# EAGLE board The_project v98 (EAGLE 9.7.0)
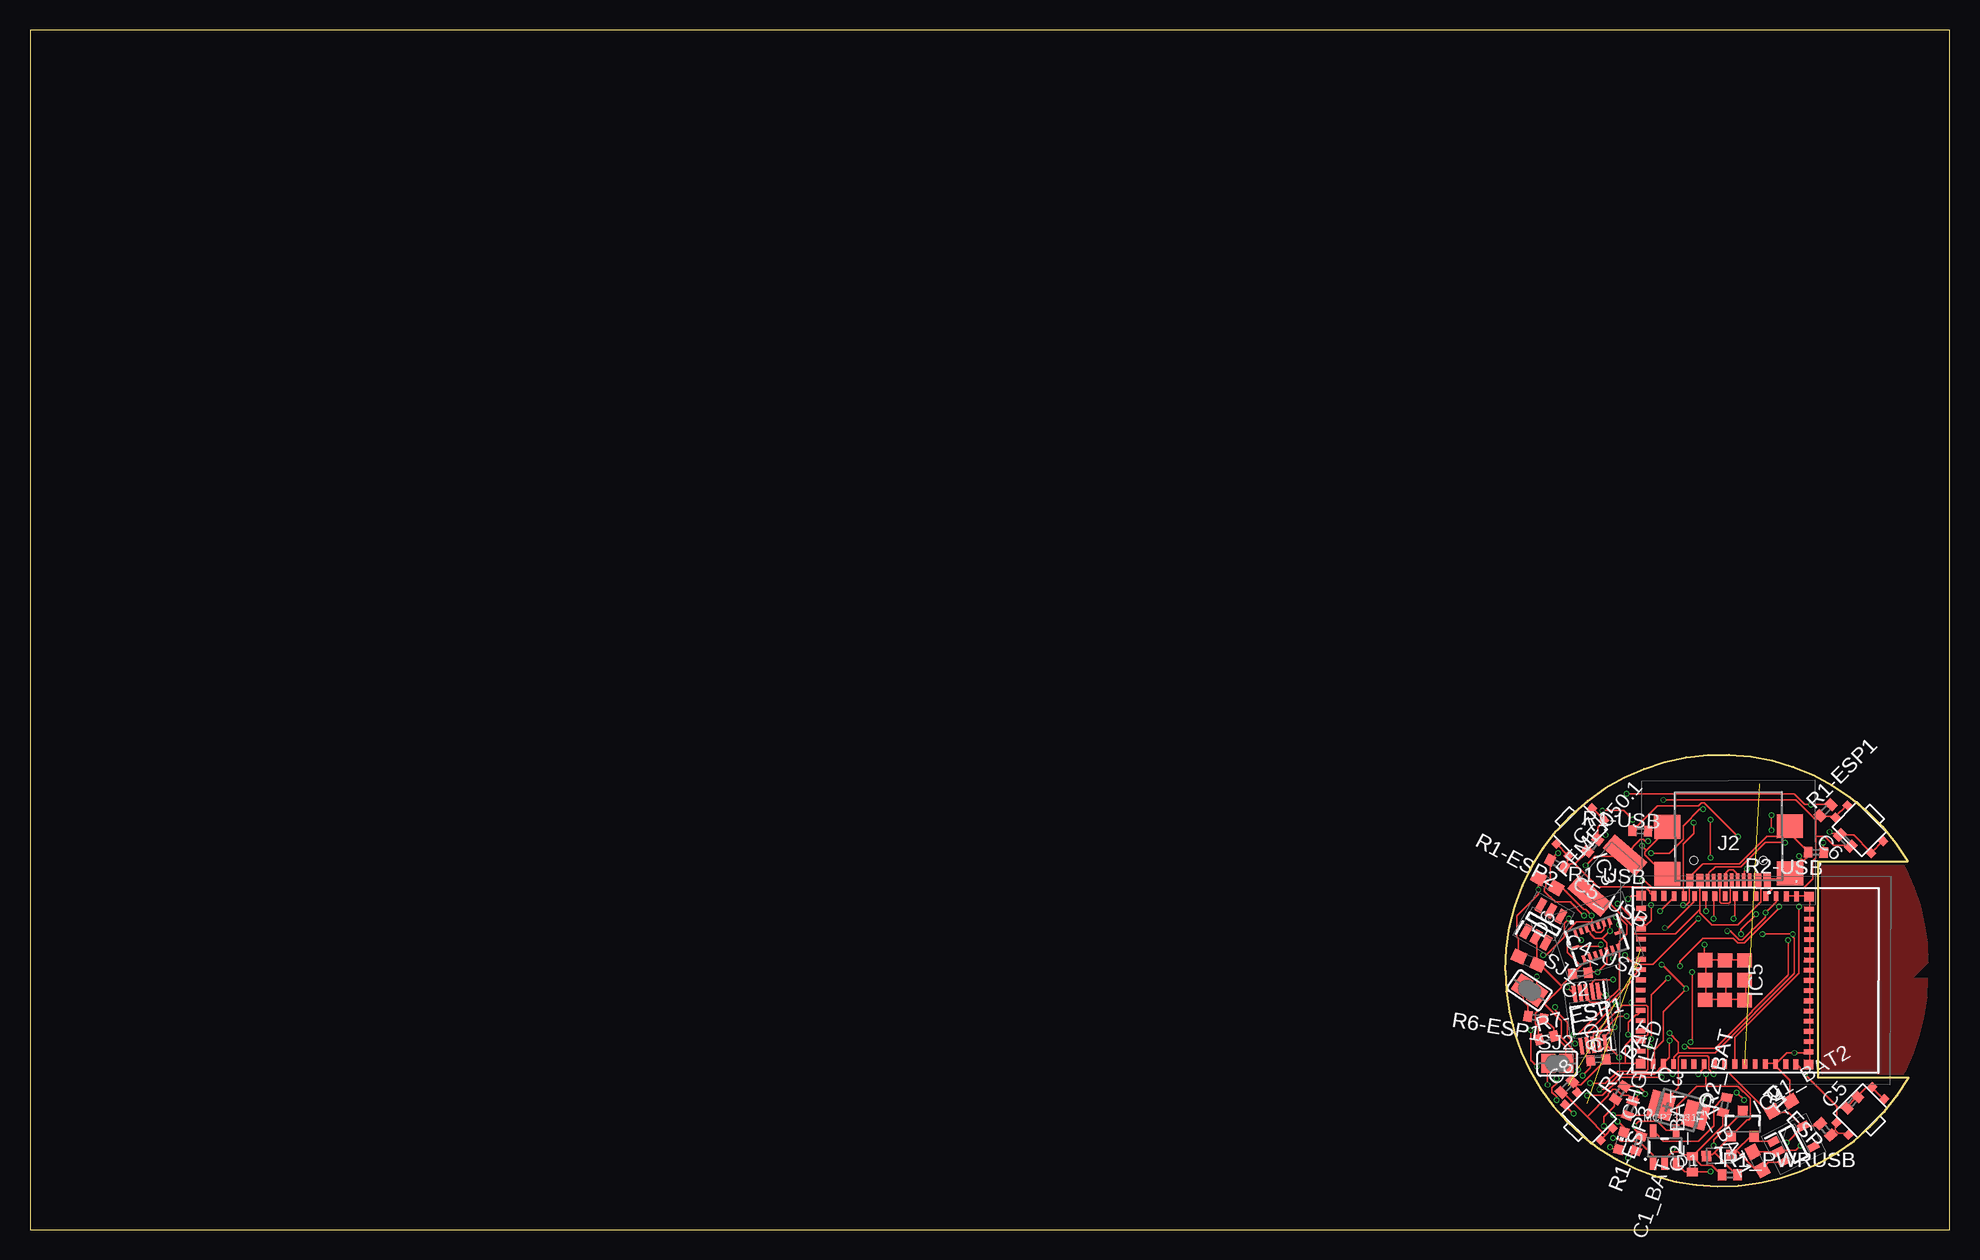
[diagram p0: board, top side]
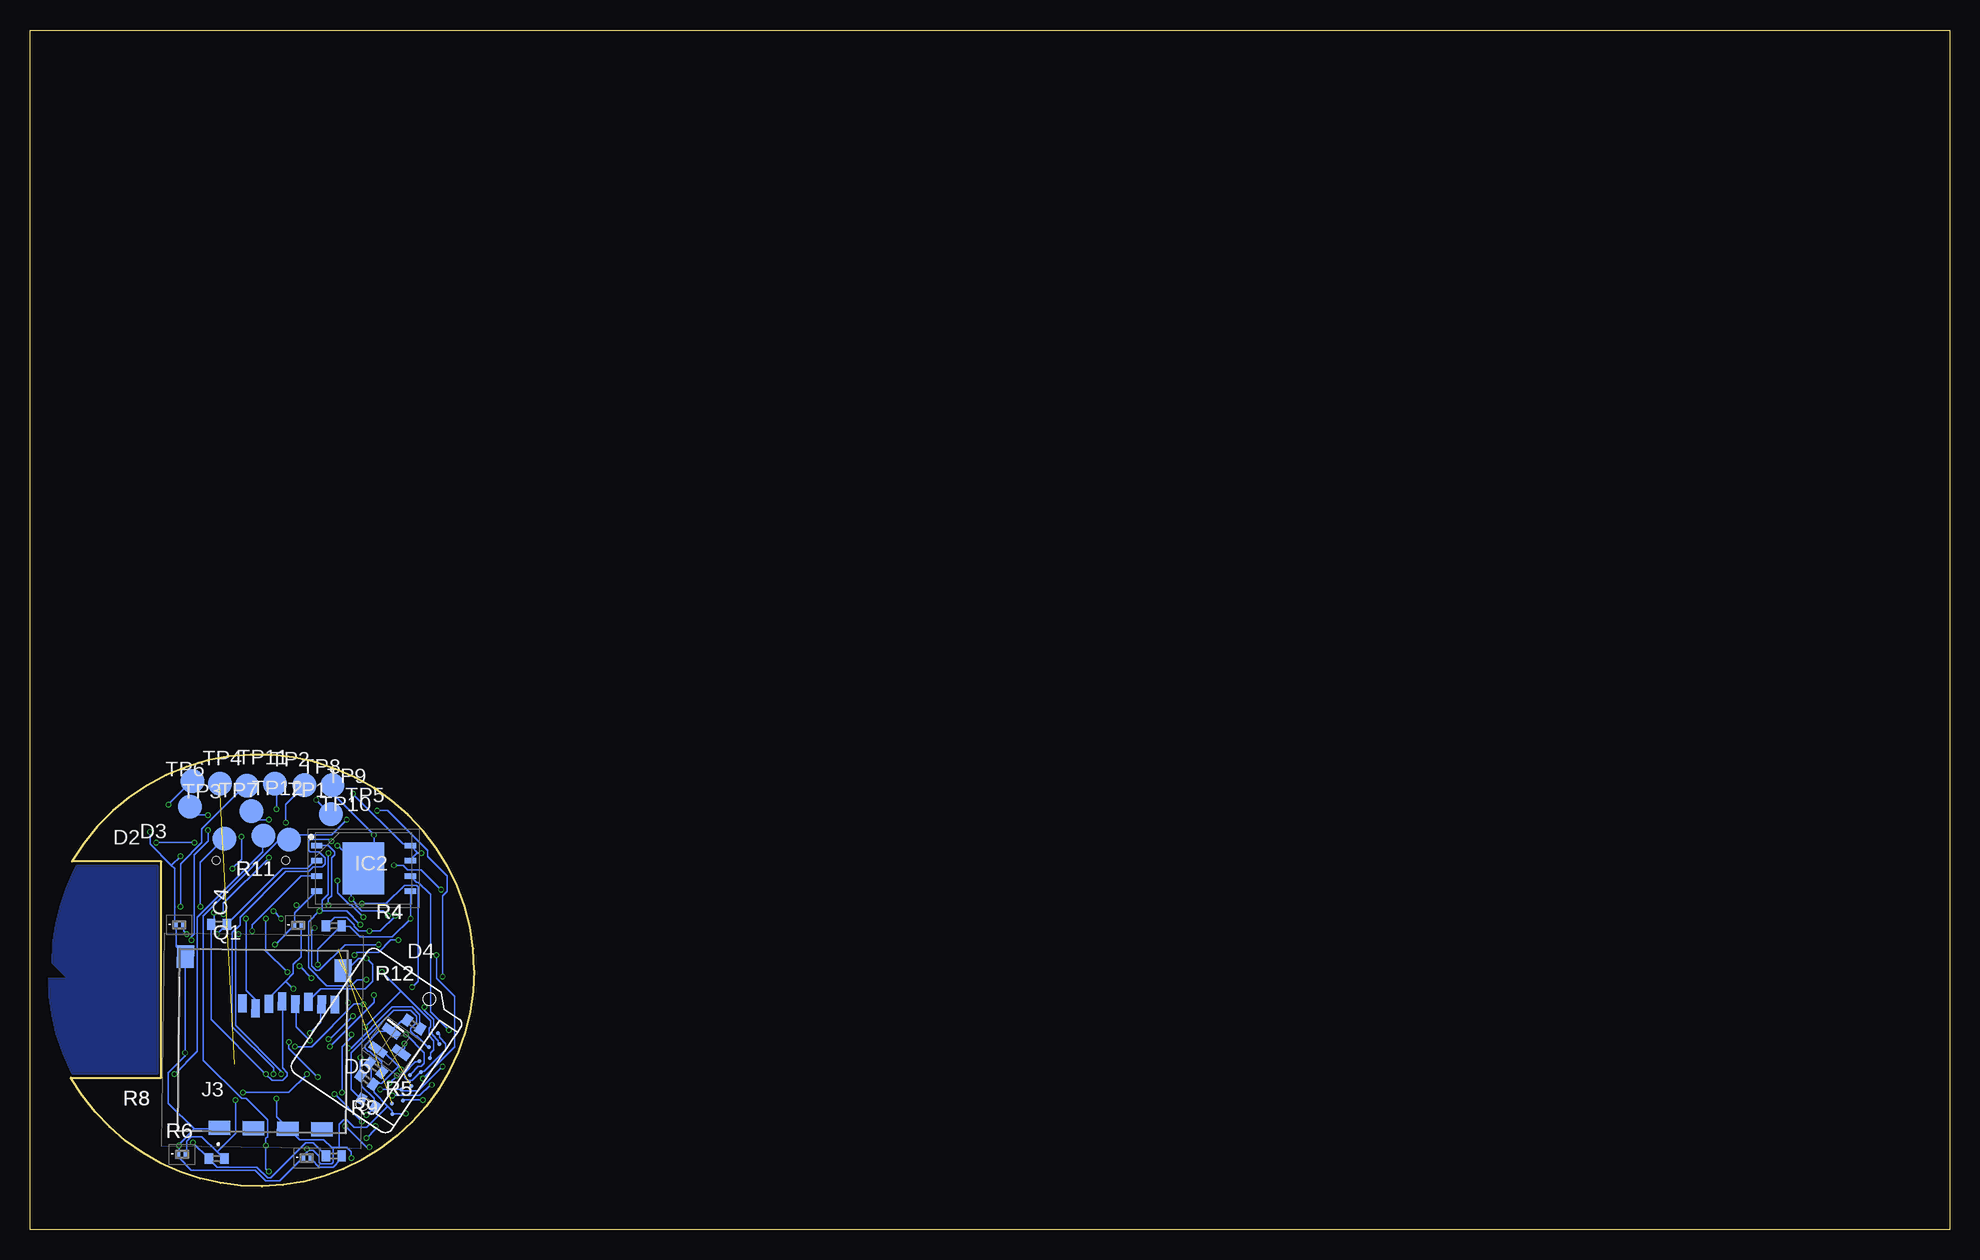
[diagram p1: board, bottom side, seen from below]

Size 160 x 100 mm. Coordinates in mm from the lower left corner, seen from the top.
Outline: 0,0 160,0 160,100 0,100 0,0
Outline: 122.97,21.6 arc150 156.59,12.65 149.05,12.65 149.05,30.67 156.51,30.67 arc150 122.97,21.6
Copper layers (1*16): Top / Bottom
Stack-up Default Layer Stack: Top User Defined 0.035mm / Dielectric-1 User Defined 1.6mm / Bottom User Defined 0.035mm
Design rules: minimum copper width 5mil, minimum drill size 0.3mm, copper clearance wire_polygon to wire_polygon 5mil, copper clearance wire_polygon to pad_smd 5mil, copper clearance wire_polygon to via 5mil, copper clearance pad_smd to pad_smd 5mil, copper clearance pad_smd to via 5mil, copper clearance via to via 5mil, copper clearance smd to pad (same net) 5mil, copper clearance smd to via (same net) 5mil, copper clearance smd to smd (same net) 5mil, dimension clearance 0.2mm, via restrict clearance 0mil, restrict clearance 0mil, drill distance 6mil, keepout clearance 0mil

## Footprints (pad centres in the part's own frame; a part is rotated, then mirrored left to right if it is on the bottom)
RRR = smd 0.62 x 0.6: P$1 -2.1,0.71; P$2 -2.1,-0.71; P$3 2.1,0.71; P$4 2.1,-0.71
EAGLE-LTSPICE_C0402 = smd 0.7 x 0.9: 1 -0.65,0; 2 0.65,0
RCL_C0603 = smd 1.1 x 1: 1 -0.85,0; 2 0.85,0
CT3528 = smd 2 x 2.2: + -1.5,0; - 1.5,0
ADAFRUIT_CHIP-LED0603 = smd 0.8 x 0.8: A 0,-0.75; C 0,0.75
AVX---SD0805S020S1R0_AVX_SD0805S020S1R0_0 = smd 0.8 x 0.9: 1 -1.05,0; 2 1.05,0
PESD5V0S1BL315 = smd 0.4 x 0.7: 1 -0.35,0; 2 0.35,0
SOT95P280X145-6N = smd 1.2 x 0.6: 1 -1.25,0.95; 2 -1.25,0; 3 -1.25,-0.95; 4 1.25,-0.95; 5 1.25,0; 6 1.25,0.95
SON127P800X600X80-9N = smd 0.95 x 0.45: 1 -3.9,1.905; 2 -3.9,0.635; 3 -3.9,-0.635; 4 -3.9,-1.905; 5 3.9,-1.905; 6 3.9,-0.635; 7 3.9,0.635; 8 3.9,1.905 | smd 3.45 x 4.35: 9 0,0
BMI085 = smd 0.675 x 0.25: 1 1.165,1.5; 2 1.165,1; 3 1.165,0.5; 4 1.165,0; 5 1.165,-0.5; 6 1.165,-1; 7 1.165,-1.5; 9 -1.165,-1.5; 10 -1.165,-1; 11 -1.165,-0.5; 12 -1.165,0; 13 -1.165,0.5; 14 -1.165,1; 15 -1.165,1.5 | smd 0.25 x 0.675: 8 0,-1.915; 16 0,1.915
SOT95P280X120-5N = smd 0.9 x 0.6: 1 -1.4,0.95; 2 -1.4,0; 3 -1.4,-0.95; 4 1.4,-0.95; 5 1.4,0.95
ESP32S3MINI1N8 = smd 0.8 x 0.4: 1 -7,5.95; 2 -7,5.1; 3 -7,4.25; 4 -7,3.4; 5 -7,2.55; 6 -7,1.7; 7 -7,0.85; 8 -7,0; 9 -7,-0.85; 10 -7,-1.7; 11 -7,-2.55; 12 -7,-3.4; 13 -7,-4.25; 14 -7,-5.1; 15 -7,-5.95; 31 7,-5.95; 32 7,-5.1; 33 7,-4.25; 34 7,-3.4; 35 7,-2.55; 36 7,-1.7; 37 7,-0.85; 38 7,0; 39 7,0.85; 40 7,1.7; 41 7,2.55; 42 7,3.4; 43 7,4.25; 44 7,5.1; 45 7,5.95 | smd 0.4 x 0.8: 16 -5.95,-7; 17 -5.1,-7; 18 -4.25,-7; 19 -3.4,-7; 20 -2.55,-7; 21 -1.7,-7; 22 -0.85,-7; 23 0,-7; 24 0.85,-7; 25 1.7,-7; 26 2.55,-7; 27 3.4,-7; 28 4.25,-7; 29 5.1,-7; 30 5.95,-7; 46 5.95,7; 47 5.1,7; 48 4.25,7; 49 3.4,7; 50 2.55,7; 51 1.7,7; 52 0.85,7; 53 0,7; 54 -0.85,7; 55 -1.7,7; 56 -2.55,7; 57 -3.4,7; 58 -4.25,7; 59 -5.1,7; 60 -5.95,7 | smd 1.2 x 1.2: 61 0,0; 66 -1.65,1.65; 67 -1.65,0; 68 -1.65,-1.65; 69 0,-1.65; 70 1.65,-1.65; 71 1.65,0; 72 1.65,1.65; 73 0,1.65 | smd 0.8 x 0.8: 62 -7,7; 63 -7,-7; 64 7,-7; 65 7,7
SOP50P490X110-10N = smd 1.4 x 0.3: 1 -2.2,1; 2 -2.2,0.5; 3 -2.2,0; 4 -2.2,-0.5; 5 -2.2,-1; 6 2.2,-1; 7 2.2,-0.5; 8 2.2,0; 9 2.2,0.5; 10 2.2,1
LCD = smd 0.35 x 0.35: P$1 4,3.35; P$2 4.62,2.65; P$3 4,1.95; P$4 4.62,1.25; P$5 4,0.55; P$6 4.62,-0.15; P$7 4,-0.85; P$8 4.62,-1.55; P$9 4.1,-2.25; P$10 4.72,-2.95; P$11 4.1,-3.65; P$12 4.62,-4.35
USB4110GFA = smd 0.3 x 1.15: A1 -3.35,3.678; A4 -2.55,3.678; A5 -1.25,3.678; A6 -0.25,3.678; A7 0.25,3.678; A8 1.25,3.678; A9 2.55,3.678; A12 3.4,3.678; B1 3.1,3.678; B4 2.25,3.678; B5 1.75,3.678; B6 0.75,3.678; B7 -0.75,3.678; B8 -1.75,3.678; B9 -2.25,3.678; B12 -3.05,3.678 | smd 2.18 x 2: MP1 -5.11,-0.827; MP2 5.11,-0.827; MP3 -5.11,3.103; MP4 5.11,3.103 | hole 0.65: -2.89,2.003; 2.89,2.003
112ATAARR03ATTEND = smd 1.8 x 1.2: G1 10.6,10.4; G2 4.9,10.4; S1 7.75,10.4; S2 2.05,10.4 | smd 1.4 x 1.9: G3 13.6,-3.85; G4 0.45,-2.85 | smd 0.7 x 1.5: P1 8.8,0; P2 7.7,0.4; P3 6.6,0; P4 5.5,-0.2; P5 4.4,0; P6 3.3,-0.2; P7 2.2,0; P8 1.1,0
SPARKFUN-IC-POWER_SOT23-5 = smd 0.55 x 1.2: 1 -0.95,-1.3; 2 0,-1.3; 3 0.95,-1.3; 4 0.95,1.3; 5 -0.95,1.3
VARISTOR_CT/CN1812 = smd 1.5 x 3.6: 1 -2.25,0; 2 2.25,0
SOT96P240X120-3N = smd 1.55 x 0.65: 1 -0.85,0.96; 2 -0.85,-0.96; 3 0.85,0
EAGLE-LTSPICE_R0402 = smd 0.7 x 0.9: 1 -0.65,0; 2 0.65,0
SJ = smd 1.168 x 1.6: 1 -0.762,0; 2 0.762,0
SPARKFUN-DISCRETESEMI_SOT23-3 = smd 0.8 x 0.9: 1 -0.95,-1; 2 0.95,-1; 3 0,1.1
TP20R = smd 2 x 2: TP 0,0

## Placement (x,y rotation side)
BUTTON1  [RRR]  129.22,33.13 225 top
BUTTON2  [RRR]  129.95,9.42 315 top
BUTTON3  [RRR]  152.57,9.89 45 top
BUTTON4  [RRR]  152.49,33.36 135 top
C1  1uF  [EAGLE-LTSPICE_C0402]  130.74,14.14 5.2 top
C1_BAT  4.7uF  [EAGLE-LTSPICE_C0402]  134.06,7.18 251 top
C1_BAT1  4.7uF  [RCL_C0603]  143.99,5.72 118.7 top
C1_BAT2  4.7uF  [RCL_C0603]  146,10.28 30.2 top
C2  1uF  [EAGLE-LTSPICE_C0402]  129.22,21.36 184.8 top
C2_BAT  4.7uF  [EAGLE-LTSPICE_C0402]  138.57,5.45 90 top
C3  100uF  [CT3528]  137.42,9.95 344.4 top
C4  100nF  [EAGLE-LTSPICE_C0402]  131.91,12.48 325.2 bottom
C4_USB  100nF  [RCL_C0603]  124.9,22.41 336.4 top
C5  1uF  [EAGLE-LTSPICE_C0402]  151.88,10.61 227.5 top
C5_USB  4.7uF  [RCL_C0603]  126.48,28.9 330.1 top
C6  100nF  [EAGLE-LTSPICE_C0402]  151.31,32.43 134.7 top
C7  100nF  [EAGLE-LTSPICE_C0402]  130.25,32.02 49.3 top
C8  100nF  [EAGLE-LTSPICE_C0402]  128.1,11.89 45 top
CHG_LED  [ADAFRUIT_CHIP-LED0603]  132.64,7.4 344 top
D1  AVX---SD0805S020S1R0_AVX_SD0805S020S1R0AVX_SD0805S020S1R0_0_0  [AVX---SD0805S020S1R0_AVX_SD0805S020S1R0_0]  140.78,6.16 182.5 top
D2  PESD3V3S1BLYL  [PESD5V0S1BL315]  147.56,25.39 0 bottom
D3  PESD3V3S1BLYL  [PESD5V0S1BL315]  137.66,25.35 0 bottom
D4  PESD3V3S1BLYL  [PESD5V0S1BL315]  147.33,6.26 0 bottom
D5  PESD3V3S1BLYL  [PESD5V0S1BL315]  136.93,5.96 0 bottom
D6  USBLC6-2SC6Y  [SOT95P280X145-6N]  126.16,25.47 60.9 top
IC2  W25Q256JVEIQ  [SON127P800X600X80-9N]  132.2,30.1 0 bottom
IC3  BMI085  [BMI085]  130.6,24.13 108.7 top
IC4  XC6220A331MR-G  [SOT95P280X120-5N]  146.99,7.13 27.2 top
IC5  ESP32-S3-MINI-1-N8  [ESP32S3MINI1N8]  141.27,20.79 269.8 top
IC6  DRV2605LDGST  [SOP50P490X110-10N]  130.02,17.59 277.5 top
J1  PCA-6-LA-12-HL-3-T_RECRANN  [LCD]  131.17,15.83 325.9 bottom
J2  USB4110-GF-A  [USB4110GFA]  141.58,32.78 180.3 top
J3  112A-TAAR-R03_ATTEND  [112ATAARR03ATTEND]  133.49,18.74 179.3 bottom
MCP73831  SPARKFUN-IC-POWER_MCP73831  [SPARKFUN-IC-POWER_SOT23-5]  136.24,6.86 0 top
PFMF.050.1  500mA  [VARISTOR_CT/CN1812]  131.48,29.51 49.1 top
Q1  2N7002  [SOT96P240X120-3N]  129.75,15.26 323.6 bottom
R1-ESP  10k  [EAGLE-LTSPICE_R0402]  149.66,8.35 132.7 top
R1-ESP1  10k  [EAGLE-LTSPICE_R0402]  149.68,34.96 45 top
R1-ESP2  10k  [EAGLE-LTSPICE_R0402]  127.29,30.47 151.9 top
R1-ESP3  10k  [EAGLE-LTSPICE_R0402]  133.38,10.11 248.7 top
R1-USB  5K1  [EAGLE-LTSPICE_R0402]  134.23,33.22 177.5 top
R1_BAT  200  [EAGLE-LTSPICE_R0402]  132.53,11.4 56.1 top
R1_PWRUSB  100k  [EAGLE-LTSPICE_R0402]  141.69,4.55 0 top
R2-USB  5K1  [EAGLE-LTSPICE_R0402]  148.87,31.45 178.2 top
R2_BAT  2K  [EAGLE-LTSPICE_R0402]  141.26,10.38 76.8 top
R4  10k  [EAGLE-LTSPICE_R0402]  134.68,6.13 0 bottom
R5  10k  [EAGLE-LTSPICE_R0402]  144.44,5.91 0 bottom
R6  10k  [EAGLE-LTSPICE_R0402]  134.67,25.32 0 bottom
R6-ESP1  100K  [EAGLE-LTSPICE_R0402]  125.52,17.68 170.7 top
R7-ESP1  100K  [EAGLE-LTSPICE_R0402]  126.41,15.98 13.6 top
R8  10k  [EAGLE-LTSPICE_R0402]  144.25,25.45 0 bottom
R9  22  [EAGLE-LTSPICE_R0402]  131.8,10.56 149.6 bottom
R11  10K  [EAGLE-LTSPICE_R0402]  128,17.09 326.8 bottom
R12  10K  [EAGLE-LTSPICE_R0402]  131.18,13.48 321.5 bottom
SJ1  [SJ]  124.99,19.95 325.8 top
SJ2  [SJ]  127.31,13.84 0 top
T1  9A/30V/15mΩ  [SPARKFUN-DISCRETESEMI_SOT23-3]  142.76,8.78 359.5 top
TP1  TPTP20R  [TP20R]  143.79,32.58 0 bottom
TP2  TPTP20R  [TP20R]  146.68,35.24 0 bottom
TP3  TPTP20R  [TP20R]  146.48,37.37 0 bottom
TP4  TPTP20R  [TP20R]  134.8,37.05 0 bottom
TP5  TPTP20R  [TP20R]  138.43,32.52 0 bottom
TP6  TPTP20R  [TP20R]  139.57,37.16 0 bottom
TP7  TPTP20R  [TP20R]  137.14,37.06 0 bottom
TP8  TPTP20R  [TP20R]  141.56,34.86 0 bottom
TP9  TPTP20R  [TP20R]  140.55,32.85 0 bottom
TP10  TPTP20R  [TP20R]  134.9,34.63 0 bottom
TP11  TPTP20R  [TP20R]  144.18,37.16 0 bottom
TP12  TPTP20R  [TP20R]  141.9,36.98 0 bottom

## Library data of the parts
BUTTON1-BUTTON4 = MY_BTN
C1 C1_BAT C2 C2_BAT C4-C8 = Hector_Watch; SPICEMODEL: NONE; SPICEPREFIX: C
C1_BAT1 C1_BAT2 C3 C4_USB C5_USB = Hector_Watch; SPICEPREFIX: C
CHG_LED PFMF.050.1 SJ1 SJ2 TP1-TP12 = Hector_Watch
D1 = Hector_Watch; CENTROID_NOT_SPECIFIED: No; DATASHEET: http://datasheets.avx.com/schottky.pdf; DIGIKEY_DESCRIPTION: DIODE SCHOTTKY 20V 1A 0805; DIGIKEY_PART_NUMBER: 478-7800-1-ND; LEAD_FREE: yes; MF: AVX; MOUSER_PART_NUMBER: 581-SD0805S020S1R0; MPN: SD0805S020S1R0; PACKAGE: 0805 (2012 metric); PREFIX: D; ROHS: yes; TEMPERATURE_RANGE_HIGH: +125°C; TEMPERATURE_RANGE_LOW: -55°C
D2-D5 = Hector_Watch; ARROW_PART_NUMBER: PESD3V3S1BLYL; ARROW_PRICE-STOCK: https://www.arrow.com/en/products/pesd3v3s1blyl/nexperia?region=nac; DESCRIPTION: PESD3V3S1BL - Low capacitance bidirectional ESD protection diode; HEIGHT: 0mm; MANUFACTURER_NAME: Nexperia; MANUFACTURER_PART_NUMBER: PESD3V3S1BLYL; MOUSER_PART_NUMBER: 771-PESD3V3S1BLYL; MOUSER_PRICE-STOCK: https://www.mouser.co.uk/ProductDetail/Nexperia/PESD3V3S1BLYL?qs=vLWxofP3U2zWoKHYJMVoKQ%3D%3D
D6 = Hector_Watch; ARROW_PART_NUMBER: USBLC6-2SC6Y; ARROW_PRICE-STOCK: https://www.arrow.com/en/products/usblc6-2sc6y/stmicroelectronics?region=nac; DESCRIPTION: Low Cap. ESD Protection Auto SOT-23-6 STMicroelectronics USBLC6-2SC6Y, Dual Uni-Directional TVS Diode Array, 6-Pin SOT-23; HEIGHT: 1.45mm; MANUFACTURER_NAME: STMicroelectronics; MANUFACTURER_PART_NUMBER: USBLC6-2SC6Y; MOUSER_PART_NUMBER: 511-USBLC6-2SC6Y; MOUSER_PRICE-STOCK: https://www.mouser.co.uk/ProductDetail/STMicroelectronics/USBLC6-2SC6Y?qs=gNDSiZmRJS%2FOgDexvXkdow%3D%3D
IC2 = Hector_Watch; ARROW_PART_NUMBER: W25Q256JVEIQ; ARROW_PRICE-STOCK: https://www.arrow.com/en/products/w25q256jveiq/winbond-electronics?region=nac; DESCRIPTION: 256M-bit Serial Flash Memory with uniform 4KB sectors and Dual/Quad SPI; HEIGHT: 0.8mm; MANUFACTURER_NAME: Winbond; MANUFACTURER_PART_NUMBER: W25Q256JVEIQ; MOUSER_PART_NUMBER: 454-W25Q256JVEIQ; MOUSER_PRICE-STOCK: https://www.mouser.co.uk/ProductDetail/Winbond/W25Q256JVEIQ?qs=qSfuJ%252Bfl%2Fd4o%2FNFUf7yCgA%3D%3D
IC3 = Hector_Watch; ARROW_PART_NUMBER: BMI085; ARROW_PRICE-STOCK: https://www.arrow.com/en/products/bmi085/bosch; DESCRIPTION: IMUs - Inertial Measurement Units High-performance IMU BMI085 for virtual and augmented reality applications; HEIGHT: 1mm; MANUFACTURER_NAME: BOSCH; MANUFACTURER_PART_NUMBER: BMI085; MOUSER_PART_NUMBER: 262-BMI085; MOUSER_PRICE-STOCK: https://www.mouser.co.uk/ProductDetail/Bosch-Sensortec/BMI085?qs=y6ZabgHbY%252ByGCM8LfWZyqA%3D%3D
IC4 = Hector_Watch; DESCRIPTION: LDO Voltage Regulators; HEIGHT: 1.2mm; MANUFACTURER_NAME: Torex; MANUFACTURER_PART_NUMBER: XC6220A331MR-G; MOUSER_PART_NUMBER: 865-XC6220A331MR-G; MOUSER_PRICE-STOCK: https://www.mouser.co.uk/ProductDetail/Torex-Semiconductor/XC6220A331MR-G?qs=AsjdqWjXhJ8ZSWznL1J0gg%3D%3D
IC5 = Hector_Watch; DESCRIPTION: WiFi Development Tools - 802.11 [Engineering Samples] SMD Module, ESP32-S3FN8, 8 MB SPI Flash, PCB Antenna; HEIGHT: 2.55mm; MANUFACTURER_NAME: Espressif Systems; MANUFACTURER_PART_NUMBER: ESP32-S3-MINI-1-N8; MOUSER_PART_NUMBER: 356-ESP32-S3-MINI1N8; MOUSER_PRICE-STOCK: https://www.mouser.co.uk/ProductDetail/Espressif-Systems/ESP32-S3-MINI-1-N8?qs=XAiT9M5g4x82rl6F%2FIYUQg%3D%3D
IC6 = Hector_Watch; ARROW_PART_NUMBER: DRV2605LDGST; ARROW_PRICE-STOCK: https://www.arrow.com/en/products/drv2605ldgst/texas-instruments?region=nac; DESCRIPTION: ERM & LRA Device Haptic Driver 2-5V BGA9 Texas Instruments DRV2605LDGST Piezo Haptic Motor Driver IC, 5 V, 10-Pin VSSOP; HEIGHT: 1.1mm; MANUFACTURER_NAME: Texas Instruments; MANUFACTURER_PART_NUMBER: DRV2605LDGST; MOUSER_PART_NUMBER: 595-DRV2605LDGST; MOUSER_PRICE-STOCK: https://www.mouser.co.uk/ProductDetail/Texas-Instruments/DRV2605LDGST?qs=asCBFxFfL1TjvcNdZsR2BA%3D%3D
J1 = Library3
J2 = Library; DESCRIPTION: CONN USB 2.0 TYPE-C R/A SMT; HEIGHT: 3.26mm; MANUFACTURER_NAME: GCT (GLOBAL CONNECTOR TECHNOLOGY); MANUFACTURER_PART_NUMBER: USB4110-GF-A; MOUSER_PART_NUMBER: 640-USB4110-GF-A; MOUSER_PRICE-STOCK: https://www.mouser.co.uk/ProductDetail/GCT/USB4110-GF-A?qs=KUoIvG%2F9IlYiZvIXQjyJeA%3D%3D
J3 = Hector_Watch; DESCRIPTION: Micro SD Card Socket, Push-Push Type, Top Mount, SMT, H=1.83mm, 10u; HEIGHT: 1.9mm; MANUFACTURER_NAME: ATTEND; MANUFACTURER_PART_NUMBER: 112A-TAAR-R03 ATTEND
MCP73831 = Hector_Watch; PROD_ID: IC-09995
Q1 = Hector_Watch; ARROW_PART_NUMBER: 2N7002; ARROW_PRICE-STOCK: https://www.arrow.com/en/products/2n7002/on-semiconductor?region=europe; DESCRIPTION: N-channel MOSFET,2N7002 0.115A 60V; HEIGHT: 1.2mm; MANUFACTURER_NAME: onsemi; MANUFACTURER_PART_NUMBER: 2N7002; MOUSER_PART_NUMBER: 512-2N7002; MOUSER_PRICE-STOCK: https://www.mouser.co.uk/ProductDetail/onsemi-Fairchild/2N7002?qs=0dwsXDNhqlz66WJJhrTFjQ%3D%3D
R1-ESP R1-ESP1-R1-ESP3 R1-USB R1_BAT R1_PWRUSB R2-USB R2_BAT R4-R6 R6-ESP1 R7-ESP1 R8 R9 R11 R12 = Hector_Watch; SPICEMODEL: NONE; SPICEPREFIX: R
T1 = Hector_Watch; PROD_ID: TRANS-14715

## Nets
3V3: C1_BAT2.1 C2.1 C3.+ C4.1 IC2.3 IC2.7 IC2.8 IC3.3 IC3.7 IC3.11 IC3.14 IC4.5 IC5.3 IC6.10 J1.P$4 J3.P4 R1-ESP1.2 R1-ESP2.2 R1-ESP3.2 R1-ESP.2 R4.1 R5.1 R6.1 R8.1 R9.1 TP3.TP
ADC_BAT: IC5.9 SJ2.1
BOOT: BUTTON4.P$3 BUTTON4.P$4 C6.1 IC5.4 R1-ESP1.1 TP10.TP
BUTTON1: BUTTON1.P$3 BUTTON1.P$4 C7.1 IC5.15 R1-ESP2.1
BUTTON2: BUTTON2.P$3 BUTTON2.P$4 C8.1 IC5.26 R1-ESP3.1
D+: IC5.24
D-: IC5.23
DISP_RST: IC5.20 J1.P$11
DN: J2.A7 J2.B7
DP: J2.A6 J2.B6
EN_DRV: IC5.17 IC6.5
GND: BUTTON1.P$1 BUTTON1.P$2 BUTTON2.P$1 BUTTON2.P$2 BUTTON4.P$1 BUTTON4.P$2 C1.2 C1_BAT1.2 C1_BAT2.2 C1_BAT.2 C2.2 C2_BAT.2 C3.- C4.2 C4_USB.2 C5_USB.2 C6.2 C7.2 C8.2 D2.1 D3.1 D4.1 D5.1 D6.2 IC2.4 IC2.9 IC3.4 IC3.6 IC3.10 IC3.15 IC4.2 IC5.1 IC5.2 IC5.42 IC5.43 IC5.46 IC5.47 IC5.48 IC5.49 IC5.50 IC5.51 IC5.52 IC5.53 IC5.54 IC5.55 IC5.56 IC5.57 IC5.58 IC5.59 IC5.60 IC5.61 IC5.62 IC5.63 IC5.64 IC5.65 IC5.66 IC5.67 IC5.68 IC5.69 IC5.70 IC5.71 IC5.72 IC5.73 IC6.8 J1.P$1 J1.P$5 J1.P$6 J1.P$12 J2.A1 J2.A12 J2.B1 J2.B12 J2.MP1 J2.MP2 J2.MP3 J2.MP4 J3.G1 J3.G2 J3.G3 J3.G4 J3.P6 MCP73831.2 Q1.2 R1_PWRUSB.1 R2-USB.2 R2_BAT.1 R7-ESP1.1 R12.1 TP4.TP
ID_DRV: IC6.4
IMU_INT1: IC3.16 IC5.11
IMU_INT2: IC3.1 IC5.10
IN_DRV: IC5.16
LEDA: J1.P$3 R9.2
LEDK: J1.P$2 Q1.3
MISO: D2.2 IC2.2 IC5.33 J3.P7 R8.2
MOSI: D3.2 IC2.5 IC5.31 J1.P$10 J3.P3 R6.2
N$1: R1-USB.1
N$3: J2.A5 R1-USB.2
N$4: C1_BAT1.1 D1.1 IC4.1 IC4.3 T1.2
N$5: D6.1
N$6: D6.4
N$7: R6-ESP1.2 SJ1.1
N$9: Q1.1 R11.1 R12.2
N$10: R6-ESP1.1 R7-ESP1.2 SJ2.2
N$11: J2.B5 R2-USB.1
N$12: CHG_LED.C R1_BAT.2
N$13: C1.1 IC6.1
N$14: D6.5
N$15: J2.B9
N$16: MCP73831.1 R1_BAT.1
N$17: D6.6
N$18: MCP73831.5 R2_BAT.2
N$19: D6.3
PIN_LED: IC5.30 R11.2
PPG_INT: IC5.36 TP8.TP
RESET: BUTTON3.P$1 BUTTON3.P$2 BUTTON3.P$3 BUTTON3.P$4 C5.1 C5.2 IC5.45 R1-ESP.1 TP9.TP
RX: IC5.40 TP11.TP
SCK: D4.2 IC2.6 IC5.32 J1.P$9 J3.P5 R5.2
SCL: IC3.8 IC5.13 IC6.2 TP6.TP
SDA: IC3.9 IC5.12 IC6.3 TP7.TP
SS: D5.2 R4.2
SS_FLASH: IC2.1 IC5.18
SS_SD: IC5.7 J3.P2
SS_TFT: IC5.21 J1.P$8
TFT_DC: IC5.22 J1.P$7
TX: IC5.39 TP12.TP
VBAT: C2_BAT.1 MCP73831.3 SJ1.2 T1.3 TP5.TP
VBUS: C1_BAT.1 C4_USB.1 C5_USB.1 CHG_LED.A D1.2 MCP73831.4 PFMF.050.1.2 R1_PWRUSB.2 T1.1
VIBE_OUT+: IC6.9 TP1.TP
VIBE_OUT-: IC6.7 TP2.TP
VUSB: J2.A4 J2.A9 J2.B4 PFMF.050.1.1

## Tracks (layer width: path | path; a pad name or v marks a point on that pad's centre or on a via)
3V3  (via drill 0.3)
  Top 0.127: IC5.3 145.54,27.69 145.54,27.3 v144.65,26.42 144.65,26.04 142.75,24.13 142.49,24.13 141.73,24.89 v141.48,24.89 | v132.46,14.35 131.32,15.49 IC6.10 131.32,15.62 131.32,16.13 v132.08,16.89 | IC4.5 147.83,8.64 148.97,8.64 149.1,8.76 R1-ESP.2 | IC4.5 147.7,8.64 146.56,9.78 145.29,9.78 C1_BAT2.1 145.16,9.91 144.78,9.91 141.6,13.08 140.34,13.08 | 140.34,13.08 140.21,13.08 139.95,13.34 139.95,14.35 139.83,14.48 137.54,14.48 137.41,14.35 137.41,11.81 136.02,10.41 C3.+ 135.89,10.29 135.13,9.53 133.22,9.53 R1-ESP3.2 133.1,9.53 v131.95,9.53 | v146.43,7.24 147.7,8.51 IC4.5 | 140.34,13.08 v140.34,12.95 | R1-ESP1.2 150.11,35.43 v148.46,35.43 147.96,35.43 147.07,36.32 v133.1,36.32 | v127.38,31.37 127.25,31.37 126.75,30.86 R1-ESP2.2 126.75,30.73 126.75,29.21 126.36,28.83 126.36,28.57 126.24,28.45 126.24,28.19 127.13,27.3 128.4,27.3 v129.54,26.16 | 130.05,21.46 129.92,21.46 C2.1 130.05,21.46 | 130.05,21.46 v130.68,21.46 131.44,22.23 131.44,23.11 IC3.11 131.44,23.24 131.44,23.88 131.06,24.26 | 130.05,21.46 130.05,22.61 IC3.14 | 131.06,24.26 130.43,24.26 130.05,24.64 130.05,24.77 129.79,25.02 IC3.3 | 131.06,24.26 v131.7,24.89 131.7,25.65 IC3.7
  Bottom 0.127: v144.65,26.42 144.65,25.65 144.78,25.53 R8.1 144.91,25.4 144.91,17.53 v140.34,12.95 139.83,12.45 138.94,12.45 138.56,12.83 138.56,13.08 138.94,13.46 138.94,18.92 J3.P4 | v141.48,24.89 141.48,25.4 137.41,29.46 136.14,29.46 IC2.3 | R4.1 135.38,6.22 136.4,7.24 137.03,7.24 139.95,4.32 140.21,4.32 141.1,5.21 144.4,5.21 145.03,5.84 R5.1 145.16,5.97 v146.43,7.24 | v132.46,14.35 132.46,12.95 C4.1 132.33,12.83 132.33,11.94 131.32,10.92 131.32,10.29 R9.1 131.32,10.16 v131.95,9.53 | v148.46,35.43 146.56,37.34 TP3.TP | 127.64,31.37 127.76,31.37 128.27,30.86 IC2.7 | 127.64,31.37 v127.38,31.37 | 127.64,31.37 128.27,32 IC2.8 128.4,32.13 128.91,32.13 v133.1,36.32 | v130.68,21.46 129.03,19.81 | 129.03,19.81 126.62,17.4 126.62,16.89 126.75,16.76 126.75,16.13 126.36,15.75 126.36,14.99 126.62,14.73 126.62,14.35 J1.P$4 | R6.1 135.25,25.4 134.62,26.04 133.6,26.04 132.97,25.4 132.97,25.27 132.59,24.89 v131.7,24.89 130.81,24.89 v129.54,26.16 | v132.08,16.89 129.16,19.81 129.03,19.81
ADC_BAT  (via drill 0.3)
  Top 0.127: v140.34,25.91 140.34,27.69 IC5.9 | v138.56,21.46 138.56,15.75 v138.43,15.62 | v136.02,12.7 132.59,12.7 131.06,11.18 v129.79,11.18 | v126.49,12.06 126.49,13.72 SJ2.1
  Bottom 0.127: v140.34,25.91 140.34,23.24 v138.56,21.46 | v138.43,15.62 138.43,15.11 v136.02,12.7 | v129.79,11.18 127.51,11.18 126.62,12.06 v126.49,12.06
BOOT  (via drill 0.3)
  Top 0.127: 150.5,34.42 149.22,34.42 R1-ESP1.1 149.1,34.42 148.84,34.16 | 150.5,34.42 151.38,35.31 BUTTON4.P$4 | 150.5,34.42 BUTTON4.P$3 | 148.84,34.16 148.84,32.77 | 148.84,32.77 148.84,30.99 148.59,30.73 148.59,29.21 147.83,28.45 145.29,28.45 145.03,28.19 145.03,28.07 144.78,27.81 IC5.4 | 148.84,32.77 149.61,32.77 150.37,32 151.76,32 C6.1 | v136.14,35.81 147.19,35.81 148.84,34.16
  Bottom 0.127: v136.14,35.81 135,34.67 TP10.TP
BUTTON1
  Top 0.127: 128.14,30.48 128.14,31.11 BUTTON1.P$3 128.14,31.24 127.25,32.13 BUTTON1.P$4 | 128.14,30.48 127.89,30.23 R1-ESP2.1 128.14,30.48 | 128.78,30.48 130.68,28.57 134.62,28.57 135,28.19 135,28.07 135.25,27.81 IC5.15 | 128.14,30.48 128.78,30.48 | 128.78,30.48 129.79,31.5 C7.1
BUTTON2  (via drill 0.3)
  Top 0.127: 131.32,7.87 131.83,8.38 BUTTON2.P$3 | 131.32,7.87 130.94,7.49 BUTTON2.P$4 | 131.32,7.87 129.79,9.4 | 129.79,9.4 127.76,11.43 C8.1 | v133.22,16.26 133.22,17.27 133.86,17.91 133.99,17.91 134.24,18.16 IC5.26 | v133.99,11.43 133.99,11.05 133.73,10.79 R1-ESP3.1 133.6,10.79 133.22,11.18 132.72,11.18 132.21,11.68 131.95,11.68 131.57,11.3 131.57,11.18 129.79,9.4
  Bottom 0.127: v133.22,16.26 133.22,16 133.99,15.24 v133.99,11.43
DISP_RST  (1 unrouted)
DN
  Top 0.127: J2.A7 141.35,29.21 141.35,29.72 141.6,29.97 141.99,29.97 142.24,29.72 142.24,29.21 J2.B7
DP
  Top 0.127: J2.B6 140.84,27.3 140.97,27.18 141.6,27.18 141.73,27.3 141.73,29.08 J2.A6
EN_DRV  (via drill 0.3)
  Top 0.127: v132.33,27.18 133.48,26.04 134.24,26.04 IC5.17 | v128.14,20.19 128.65,19.68 IC6.5
  Bottom 0.127: v132.33,27.18 130.3,27.18 128.78,28.7 127.76,28.7 127.64,28.57 127.64,20.7 v128.14,20.19
GND  (via drill 0.3)
  Top 0.127: v131.95,22.61 131.95,23.24 IC3.10 | 128.91,12.06 128.91,11.43 BUTTON2.P$1 | 128.91,12.06 128.65,12.32 C8.2 | 132.97,13.84 131.7,13.84 131.44,14.1 C1.2 131.32,14.1 129.29,12.06 128.91,12.06 | 132.97,13.84 134.24,13.84 IC5.64 | 128.91,12.06 C8.2 | 133.48,18.67 134.75,18.67 134.87,18.54 134.87,16.26 134.75,16.13 133.73,16.13 132.97,15.37 132.97,13.84 | 133.48,18.67 132.72,18.67 130.3,16.26 130.3,15.49 IC6.8 | 133.48,18.67 v133.48,18.92 | 134.75,31.62 134.62,31.5 134.62,31.24 136.14,29.72 136.4,29.72 J2.MP4 | 134.75,31.62 136.4,33.27 136.4,33.53 J2.MP2 | BUTTON1.P$2 130.3,35.05 131.19,34.16 BUTTON1.P$1 131.19,34.04 130.68,33.53 130.68,32.89 | 130.68,32.89 130.68,32.64 C7.2 130.68,32.89 | v133.22,27.56 133.48,27.81 134.24,27.81 IC5.63 | v131.32,32.89 130.68,32.89 | v134.37,32 134.75,31.62 | IC3.6 131.19,25.53 131.19,25.02 130.94,24.77 130.56,24.77 130.3,25.02 130.3,25.15 IC3.4 130.18,25.27 130.18,25.65 | 130.18,25.65 v130.18,26.16 129.67,26.67 129.54,26.67 127.76,28.45 127.25,28.45 C5_USB.2 | D6.2 125.6,24.26 125.6,22.1 C4_USB.2 125.73,21.97 125.98,21.97 127.64,20.32 | 129.29,21.97 128.65,21.34 C2.2 128.52,21.21 127.64,20.32 | 129.29,21.97 129.54,22.23 129.54,22.48 IC3.15 | 126.24,18.8 127.64,20.19 127.64,20.32 | 126.24,18.8 125.48,18.03 125.48,17.14 125.73,16.89 125.73,15.88 R7-ESP1.1 | 130.18,25.65 128.91,25.65 128.14,24.89 128.14,23.11 129.29,21.97 | 128.91,13.34 128.91,14.73 127.64,16 127.64,17.4 126.24,18.8 | 128.91,13.34 128.91,12.95 128.65,12.7 128.65,12.45 C8.2 | IC5.66 142.88,22.48 141.35,22.48 IC5.67 141.22,22.48 139.7,22.48 IC5.68 | 139.7,19.18 139.7,20.7 IC5.69 139.7,20.83 139.7,22.35 IC5.68
  Top 0.127: IC5.73 143,20.7 143,19.18 IC5.72 142.88,19.18 141.35,19.18 | 141.35,19.18 141.35,20.7 IC5.61 | 141.35,19.18 IC5.71 141.22,19.18 139.7,19.18 | 139.7,19.18 IC5.70 | J2.B12 144.65,29.08 144.91,29.08 J2.A1 145.03,29.21 146.3,29.21 146.69,29.59 J2.MP3 146.81,29.72 147.83,30.73 | 147.83,30.73 148.21,31.11 148.21,31.37 R2-USB.2 148.21,31.5 146.43,33.27 | 146.43,33.27 146.69,33.53 J2.MP1 146.43,33.27 | 146.43,33.27 145.92,32.77 144.78,32.77 142.49,30.48 139.45,30.48 138.56,29.59 138.56,29.08 J2.B1 138.43,29.08 138.3,29.08 J2.A12 138.3,28.96 138.3,27.3 138.05,27.05 v137.79,27.05 | v139.57,23.75 139.57,22.48 IC5.68 | IC5.2 146.43,27.81 147.19,27.81 IC5.1 147.32,27.81 148.21,27.81 IC5.62 148.34,27.69 148.34,26.8 IC5.60 148.34,26.67 148.34,25.91 IC5.59 148.34,25.78 148.34,25.02 IC5.58 148.34,24.89 148.34,24.26 IC5.57 148.34,24.13 148.34,23.37 IC5.56 148.34,23.24 148.34,22.48 IC5.55 148.34,22.35 148.34,21.72 IC5.54 148.34,21.59 148.34,20.83 IC5.53 148.34,20.7 148.34,19.94 IC5.52 148.34,19.81 148.34,19.18 IC5.51 148.34,19.05 148.34,18.29 IC5.50 148.34,18.16 148.34,17.4 IC5.49 148.34,17.27 148.34,16.64 IC5.48 148.34,16.51 148.34,15.75 IC5.47 148.34,15.62 148.34,14.86 IC5.46 | IC5.43 145.41,13.84 144.65,13.84 IC5.42 | IC5.65 148.34,13.84 148.34,14.73 IC5.46 | IC5.43 145.54,13.84 146.43,14.73 v147.07,14.73 148.21,14.73 IC5.46 | C1_BAT2.2 146.69,10.79 146.69,12.45 145.41,13.72 IC5.43 | BUTTON4.P$2 154.43,32.38 153.54,31.5 BUTTON4.P$1 153.42,31.5 152.02,32.89 150.88,32.89 C6.2 150.75,33.02 150.11,33.02 v149.99,33.15 | v128.65,9.65 128.02,10.29 BUTTON2.P$2
  Top 0.127: 136.91,6.48 137.54,6.48 137.79,6.22 138.56,6.22 C2_BAT.2 | 136.91,6.48 136.27,5.84 136.27,5.59 MCP73831.2 | R1_PWRUSB.1 140.97,4.57 140.21,5.33 139.32,5.33 138.56,6.1 C2_BAT.2 | R2_BAT.1 141.1,9.65 141.1,8.64 138.68,6.22 C2_BAT.2 | C1_BAT1.2 143.64,6.48 145.67,6.48 IC4.2 145.8,6.6 147.19,6.6 v147.57,6.99 | v133.22,5.97 133.73,6.48 C1_BAT.2 | v139.45,10.92 138.94,10.41 138.94,9.65 C3.- | v136.91,6.73 136.91,6.48 | v147.45,31.11 147.83,30.73 | v129.03,13.34 128.91,13.34
  Bottom 0.127: J3.G4 133.86,21.72 133.48,21.72 132.59,22.61 v131.95,22.61 131.44,22.1 131.44,20.7 132.08,20.07 133.48,20.07 | 133.48,20.07 135.76,20.07 136.78,19.05 J3.P6 | v133.48,18.92 133.48,20.07 | 132.33,29.97 IC2.9 | 132.33,29.97 133.22,29.08 v133.22,27.56 132.84,27.18 132.84,27.05 132.33,26.54 130.56,26.54 v130.18,26.16 | IC2.9 132.08,30.23 131.32,30.99 v131.32,32.89 134.75,36.32 134.75,36.96 TP4.TP | 132.33,29.97 v134.37,32 | 132.33,29.97 IC2.9 | 137.54,26.8 136.14,28.19 IC2.4 | 137.54,26.8 137.92,26.42 137.92,25.4 D3.1 138.05,25.27 v139.57,23.75 | v137.79,27.05 137.54,26.8 | v149.99,33.15 149.99,32.13 148.21,30.35 | 148.21,30.35 147.96,30.1 147.96,25.4 D2.1 147.83,25.27 147.83,23.62 147.07,22.86 J3.G3 147.07,22.73 v147.07,14.73 147.07,14.48 148.46,13.08 148.46,10.54 146.3,8.38 | 130.18,10.29 131.32,11.43 131.32,12.06 C4.2 | 130.18,10.29 129.79,9.91 129.79,9.65 J1.P$12 129.67,9.65 v128.65,9.65 | R12.1 131.57,13.84 131.57,12.32 131.44,12.19 C4.2 | 128.78,13.08 128.78,12.7 128.52,12.45 128.14,12.45 127.51,13.08 J1.P$6 127.38,13.21 127.13,13.21 125.35,14.99 125.35,15.49 125.86,16 125.86,16.26 J1.P$1 | 128.78,13.08 127.89,13.97 127.64,13.97 J1.P$5 | 128.78,13.08 v129.03,13.34 129.29,13.59 | 129.29,13.59 130.68,14.99 130.94,14.99 Q1.2 | 129.29,13.59 130.68,12.19 131.32,12.19 C4.2 | 146.3,8.38 147.57,7.11 v147.57,6.99 147.57,6.35 D4.1 147.57,6.22 147.57,5.97 146.56,4.95 141.22,4.95 140.34,4.06 139.19,4.06 D5.1 137.16,5.97 137.16,6.22 136.78,6.6 | 146.3,8.38 144.27,8.38 J3.G1 | 136.78,6.6 136.4,6.6 135.89,6.1 135.89,5.59 135.76,5.46 134.87,5.46 134.75,5.59 134.75,6.73 134.87,6.86
  Bottom 0.127: 134.87,6.86 135.51,7.49 137.54,7.49 138.43,8.38 J3.G2 138.56,8.51 139.45,9.4 v139.45,10.92 | v133.22,5.97 133.22,6.48 133.6,6.86 134.24,6.86 | 134.87,6.86 134.24,6.86 | 136.78,6.6 v136.91,6.73 | 130.18,10.29 131.95,8.51 132.97,8.51 133.6,9.14 133.86,9.14 134.24,8.76 134.24,6.86 | 148.21,30.35 v147.45,31.11
IMU_INT1  (via drill 0.3)
  Top 0.127: v130.94,23.75 130.81,23.62 128.91,23.62 IC3.16 | v136.27,25.15 136.53,25.15 138.68,27.3 138.68,27.69 IC5.11
  Bottom 0.127: v130.94,23.75 133.73,23.75 135.89,21.59 136.14,21.59 136.53,21.97 136.53,24.89 v136.27,25.15
IMU_INT2  (via drill 0.3)
  Top 0.127: v129.29,24.13 128.91,24.51 128.91,24.64 IC3.1 | v132.97,22.86 133.73,22.1 135.25,22.1 v139.06,25.91 | v139.7,26.54 139.7,27.69 IC5.10
  Bottom 0.127: v129.29,24.13 129.92,24.13 130.94,23.11 132.72,23.11 v132.97,22.86 | v139.7,26.54 v139.06,25.91
LEDA
  Bottom 0.127: J1.P$3 126.87,15.24 127.76,16.13 127.89,16.13 128.27,16.51 128.27,16.76 127.76,17.27 127.76,17.78 128.27,18.29 129.67,18.29 133.22,14.73 133.22,11.68 132.46,10.92 R9.2
LEDK  (via drill 0.3)
  Top 0.127: v127.13,18.54 127.13,18.29 128.14,17.27 128.14,16.13 v128.78,15.49
  Bottom 0.127: v127.13,18.54 127.13,18.29 126.36,17.53 126.36,16.76 126.49,16.64 126.49,16.26 125.98,15.75 125.98,15.49 J1.P$2 | v128.78,15.49 128.78,15.11 129.03,14.86 Q1.3
MISO  (via drill 0.3)
  Top 0.127: 137.41,14.73 140.46,14.73 147.07,21.34 147.07,24.26 146.94,24.38 v146.94,24.64 v144.4,24.64 | 137.41,14.73 137.03,14.35 137.03,13.84 IC5.33 | v136.65,16.38 137.41,15.62 137.41,14.73
  Bottom 0.127: IC2.2 136.14,30.86 136.91,30.1 138.94,30.1 143.51,25.53 R8.2 143.64,25.4 v144.4,24.64 | v146.94,24.64 147.19,24.89 147.19,25.27 D2.2 | v136.65,16.38 135.76,17.27 135.76,18.67 J3.P7
MOSI  (via drill 0.3)
  Top 0.127: IC5.31 135.38,13.84 135.38,14.99 136.14,15.75 136.14,18.16 v138.05,20.07 v136.02,22.1 | v127.25,10.79 127.25,11.05 126.87,11.43 126.87,11.81 127.25,12.19 v127.25,12.57 | v126.11,22.86 126.36,22.86 127.89,24.38 127.89,25.53 v128.27,25.91
  Bottom 0.127: 138.68,20.7 140.08,19.3 140.08,18.92 J3.P3 | 138.68,20.7 138.05,21.34 138.05,22.1 137.41,22.73 137.41,25.27 D3.2 | 138.68,20.7 v138.05,20.07 | v127.25,10.79 128.91,10.79 J1.P$10 | v127.25,12.57 124.59,15.24 124.59,19.43 126.11,20.95 v126.11,22.86 | IC2.5 128.27,28.19 v128.27,25.91 129.79,24.38 132.46,24.38 133.35,25.27 133.99,25.27 R6.2 134.11,25.27 136.02,23.37 v136.02,22.1
N$2
  pour Top: 158.2,21 157,21 158.25,22.25 arc90 140.9,39.6 arc90 122.95,21.65 arc90 140.9,3.7 arc90
N$3  (via drill 0.3)
  Top 0.127: v142.37,32.77 139.57,35.56 139.32,35.56 139.06,35.31 135.64,35.31 133.6,33.27 R1-USB.2 | v143.13,30.1 142.88,29.84 142.88,29.21 J2.A5
  Bottom 0.127: v142.37,32.77 142.37,30.86 v143.13,30.1
N$4
  Top 0.127: IC4.3 146.18,5.59 144.91,5.59 144.4,5.08 C1_BAT1.1 144.27,5.08 143.76,5.08 142.24,6.6 | 142.24,6.6 143.38,7.75 143.64,7.75 T1.2 143.76,7.75 144.15,7.37 145.29,7.37 IC4.1 | 142.24,6.6 141.86,6.22 D1.1
N$7
  Top 0.127: R6-ESP1.2 124.84,17.91 124.84,18.67 124.46,19.05 124.46,20.32 SJ1.1
N$8
  pour Bottom: 158.5,21 157,21 158.2,22.2 arc90 140.9,39.5 arc90 123.15,21.75 arc90 141.2,3.7 arc90
N$9
  Bottom 0.127: R12.2 130.68,13.08 130.68,13.97 131.19,14.48 131.32,14.48 131.7,14.86 131.83,14.86 132.08,15.11 132.08,15.37 130.94,16.51 129.92,16.51 Q1.1 129.79,16.64 129.03,17.4 128.65,17.4 R11.1
N$10
  Top 0.127: R6-ESP1.1 126.24,17.53 127,16.76 127,16.26 R7-ESP1.2 127.13,16.13 128.02,15.24 128.02,13.84 SJ2.2
N$11  (via drill 0.3)
  Top 0.127: v149.48,32.26 149.48,31.5 R2-USB.1 | v146.3,32.26 144.65,32.26 142.62,30.23 140.46,30.23 139.95,29.72 139.95,29.21 J2.B5
  Bottom 0.127: v146.3,32.26 v149.48,32.26
N$12  (via drill 0.3)
  Top 0.127: v132.33,9.02 132.84,8.51 CHG_LED.C | v134.62,11.3 134.62,11.43 134.11,11.94 132.97,11.94 R1_BAT.2
  Bottom 0.127: v134.62,11.3 v132.33,9.02
N$13  (via drill 0.3)
  Top 0.127: v129.41,12.83 130.05,13.46 130.05,13.97 C1.1 | v130.05,12.19 131.32,12.19 132.33,13.21 134.75,13.21 134.87,13.34 134.87,15.11 v135,15.24 | v131.32,19.56 131.06,19.56 130.81,19.81 IC6.1
  Bottom 0.127: v130.05,12.19 v129.41,12.83 | v135,15.24 131.32,18.92 v131.32,19.56
N$16  (via drill 0.3)
  Top 0.127: v131.19,8.64 131.19,9.4 132.08,10.29 132.08,10.79 R1_BAT.1 | v131.95,7.62 132.33,7.62 132.59,7.37 133.86,7.37 134.11,7.11 134.37,7.11 135.25,6.22 135.25,5.59 MCP73831.1
  Bottom 0.127: v131.19,8.64 131.19,8.38 v131.95,7.62
N$18
  Top 0.127: R2_BAT.2 141.35,10.92 141.1,10.92 140.34,10.16 140.34,8.64 139.06,7.37 136.14,7.37 135.38,8.13 MCP73831.5
PIN_LED  (via drill 0.3)
  Top 0.127: v133.48,15.11 133.6,14.99 134.24,14.99 IC5.30
  Bottom 0.127: v133.48,15.11 133.22,15.11 129.79,18.54 128.14,18.54 127.51,17.91 127.51,16.76 R11.2
PPG_INT  (via drill 0.3)
  Top 0.127: v139.06,12.95 139.45,13.34 139.45,13.72 IC5.36 | v142.62,24.64 142.62,25.02 v143.89,26.29 | v140.08,34.16 v140.08,30.99
  Bottom 0.127: v139.06,12.95 139.06,13.21 142.88,17.02 142.88,24.38 v142.62,24.64 | v143.89,26.29 143.89,27.18 v140.08,30.99 | v140.08,34.16 140.84,34.16 141.48,34.8 TP8.TP
RESET  (via drill 0.3)
  Top 0.127: 150.5,8.26 150.5,8.89 BUTTON3.P$1 150.62,9.02 150.62,10.29 | 150.5,8.26 R1-ESP.1 | 150.5,8.26 150.75,8 151.51,8 BUTTON3.P$2 | 153.54,11.81 154.43,10.92 BUTTON3.P$4 | 150.62,10.29 150.75,10.16 151.38,10.16 | 150.62,10.29 v147.96,12.95 147.57,13.34 147.57,13.46 147.32,13.72 IC5.45 | 151.38,10.16 152.27,11.05 C5.1 152.4,11.18 153.03,11.81 153.54,11.81 | 151.38,10.16 C5.2 | 153.54,11.81 BUTTON3.P$3
  Bottom 0.127: v147.96,12.95 146.05,14.86 146.05,26.04 140.59,31.5 140.59,32.77 TP9.TP
RX  (1 unrouted)
SCK  (via drill 0.3)
  Top 0.127: v130.81,11.68 131.19,11.68 132.46,12.95 135.38,12.95 136.14,13.72 | v125.09,16.64 125.09,14.1 v125.6,13.59 | v136.65,15.75 136.65,14.35 136.14,13.84 IC5.32 136.14,13.72 | v142.24,11.43 v142.88,10.79 | 136.14,13.72 v136.91,12.95
  Bottom 0.127: 144.4,6.48 143.89,5.97 R5.2 | 144.4,6.48 145.67,7.75 146.56,7.75 146.94,7.37 146.94,6.35 D4.2 | v130.81,11.68 129.16,11.68 J1.P$9 129.03,11.56 127.64,11.56 v125.6,13.59 | v125.09,16.64 126.62,18.16 126.62,27.94 127.64,28.96 127.76,28.96 128.27,29.46 IC2.6 | v136.65,15.75 137.79,16.89 137.79,18.67 J3.P5 | 144.4,6.48 142.88,8 v142.88,10.79 | v142.24,11.43 138.43,11.43 v136.91,12.95
SCL  (via drill 0.3)
  Top 0.127: v132.46,25.4 132.46,24.77 IC3.8 | v135.89,26.54 137.03,27.69 IC5.13 | v131.95,20.83 130.43,20.83 130.18,20.57 130.18,19.94 IC6.2 | v139.45,35.05 139.19,35.05 137.79,33.66 137.79,32.51 136.65,31.37 v135.13,31.37
  Bottom 0.127: v132.46,25.4 133.6,26.54 135.64,26.54 | 135.64,26.54 v135.89,26.54 136.78,25.65 136.78,21.84 135.25,20.32 133.22,20.32 132.72,20.83 v131.95,20.83 | v139.45,35.05 139.45,37.08 TP6.TP | v135.13,31.37 135.13,27.94 135.64,27.43 135.64,26.54
SDA  (via drill 0.3)
  Top 0.127: IC6.3 129.79,19.68 129.79,19.18 130.05,18.92 131.32,18.92 132.46,20.07 132.46,23.5 IC3.9 132.46,23.62 132.46,24 133.1,24.64 133.1,25.4 132.46,26.04 v132.21,26.04 | 137.79,28.45 137.79,32.13 138.68,33.02 v138.68,33.91 | 137.79,28.45 137.79,27.81 IC5.12 | v134.37,29.08 134.62,29.08 135.25,28.45 137.79,28.45
  Bottom 0.127: v138.68,33.91 138.68,35.43 137.16,36.96 TP7.TP | v132.21,26.04 133.22,27.05 133.35,27.05 134.37,28.07 v134.37,29.08
SS
  Bottom 0.127: D5.2 136.53,5.84 135.89,5.21 134.75,5.21 134.11,5.84 134.11,6.1 R4.2
SS_FLASH  (via drill 0.3)
  Top 0.127: v135.13,27.05 135.13,25.78 134.75,25.4 134.62,25.4 134.37,25.15 IC5.18
  Bottom 0.127: v135.13,27.05 135.13,27.56 134.87,27.81 134.87,30.99 134.62,31.24 134.62,31.5 135.13,32 136.02,32 IC2.1
SS_SD  (via drill 0.3)
  Top 0.127: v141.99,25.91 142.11,26.04 142.11,27.69 IC5.7
  Bottom 0.127: v141.99,25.91 141.99,19.94 141.22,19.18 141.22,18.54 J3.P2
SS_TFT  (1 unrouted)
TFT_DC  (via drill 0.3)
  Top 0.127: v128.65,16.26 129.03,16.26 133.6,20.83 133.6,21.08 134.24,21.72 IC5.22
  Bottom 0.127: v128.65,16.26 127.13,14.73 127.13,13.84 127.38,13.59 127.64,13.59 128.27,12.95 J1.P$7
TX  (via drill 0.3)
  Top 0.127: v147.45,26.92 147.45,21.34 142.11,16 142.11,13.84 IC5.39
  Bottom 0.127: v147.45,26.92 147.45,30.48 145.67,32.26 145.67,33.4 141.99,37.08 TP12.TP
VBAT  (via drill 0.3)
  Top 0.127: MCP73831.3 137.29,5.46 137.92,4.83 138.56,4.83 C2_BAT.1 138.68,4.83 v140.08,4.83 | v140.34,6.99 140.34,7.49 141.35,8.51 141.48,8.51 142.75,9.78 T1.3 | v125.6,21.08 125.6,19.56 SJ1.2 | v131.06,34.92 132.84,34.92 v133.6,34.16
  Bottom 0.127: v140.08,4.83 140.34,5.08 v140.34,6.99 140.34,7.62 140.21,7.75 140.21,9.14 141.99,10.92 142.37,10.92 145.54,14.1 145.54,26.16 139.19,32.51 TP5.TP 138.3,32.64 138.05,32.89 134.87,32.89 v133.6,34.16 | v125.6,21.08 125.6,27.81 125.22,28.19 125.22,29.46 126.87,31.11 126.87,31.62 130.18,34.92 v131.06,34.92
VBUS  (via drill 0.3)
  Top 0.127: 140.34,6.35 141.73,7.75 T1.1 141.86,7.87 143.13,9.14 143.26,9.14 143.38,9.27 143.38,10.92 142.37,11.94 139.7,11.94 | 140.34,6.35 140.21,6.22 139.83,6.22 D1.2 | 140.34,6.35 140.46,6.35 142.24,4.57 R1_PWRUSB.2 | v131.7,6.86 131.83,6.73 132.33,6.73 CHG_LED.A | C1_BAT.1 134.24,7.87 133.73,8.38 v133.73,8.64 134.11,9.02 135.64,9.02 136.4,8.26 137.16,8.26 MCP73831.4 137.29,8.26 137.29,10.29 138.94,11.94 139.7,11.94 | C4_USB.1 124.08,22.86 124.08,24.26 123.95,24.38 123.95,26.16 125.73,27.94 v125.73,28.32 125.73,29.21 C5_USB.1 | v129.67,30.35 130.43,31.11 132.84,31.11 PFMF.050.1.2 132.97,31.24 134.24,32.51 134.49,32.51 134.62,32.38 v134.87,32.38 | v139.7,12.95 139.7,11.94
  Bottom 0.127: v131.7,6.86 131.95,6.86 v133.73,8.64 | v129.67,30.35 128.91,30.35 128.52,29.97 127.38,29.97 v125.73,28.32 | v139.7,12.95 139.7,13.46 143.13,16.89 143.13,24.77 142.49,25.4 142.49,26.04 138.68,29.84 136.78,29.84 136.4,30.23 135.64,30.23 135.38,30.48 135.38,30.99 135.89,31.5 136.65,31.5 136.78,31.62 136.78,32.38 136.65,32.51 135,32.51 v134.87,32.38
VIBE_OUT+  (via drill 0.3)
  Top 0.127: v133.1,17.78 132.33,17.78 130.81,16.26 130.81,15.49 IC6.9 | v135.13,15.88 135.13,19.56 v136.53,20.95 | v137.54,21.97 137.54,22.35 139.45,24.26 141.99,24.26 142.37,23.88 142.88,23.88 145.8,26.8 v145.8,26.92
  Bottom 0.127: v133.1,17.78 135,15.88 v135.13,15.88 | v137.54,21.97 v136.53,20.95 | v145.8,26.92 145.8,30.61 143.89,32.51 TP1.TP
VIBE_OUT-  (via drill 0.3)
  Top 0.127: v132.21,18.8 129.79,16.38 129.79,15.37 IC6.7 | v137.92,15.24 138.18,15.24 138.3,15.11 140.46,15.11 146.56,21.21 v146.56,24.13 | v145.16,34.54 v145.16,33.27
  Bottom 0.127: v132.21,18.8 132.97,18.8 136.53,15.24 v137.92,15.24 | v146.56,24.13 146.56,24.38 146.3,24.64 146.3,31.24 145.16,32.38 v145.16,33.27 | v145.16,34.54 145.92,34.54 146.56,35.18 TP2.TP
VUSB
  Top 0.127: 139.19,29.08 139.32,29.08 J2.B4 | 139.19,29.08 139.06,29.08 J2.A9 139.19,29.08 | 139.19,29.08 139.19,26.67 | 139.19,26.67 139.19,26.42 140.21,25.4 142.37,25.4 144.27,27.3 144.27,29.08 J2.A4 | 139.19,26.67 137.16,24.64 133.73,24.64 133.6,24.77 133.6,25.27 131.19,27.69 130.05,27.69 PFMF.050.1.1